# Altium PCB PCB1_new.PcbDoc (part 2 of 2)
Units mm, origin at the board's own origin, x right, y up, seen from the top; angles counter-clockwise.
Board outline 99.2 x 57.3 mm, 2 copper layers (Top Layer, Bottom Layer), stack 1.571 mm thick; 110 components, 84 nets, 483 pads, 693 vias.
Unrouted connection lines stored in the file: 9.
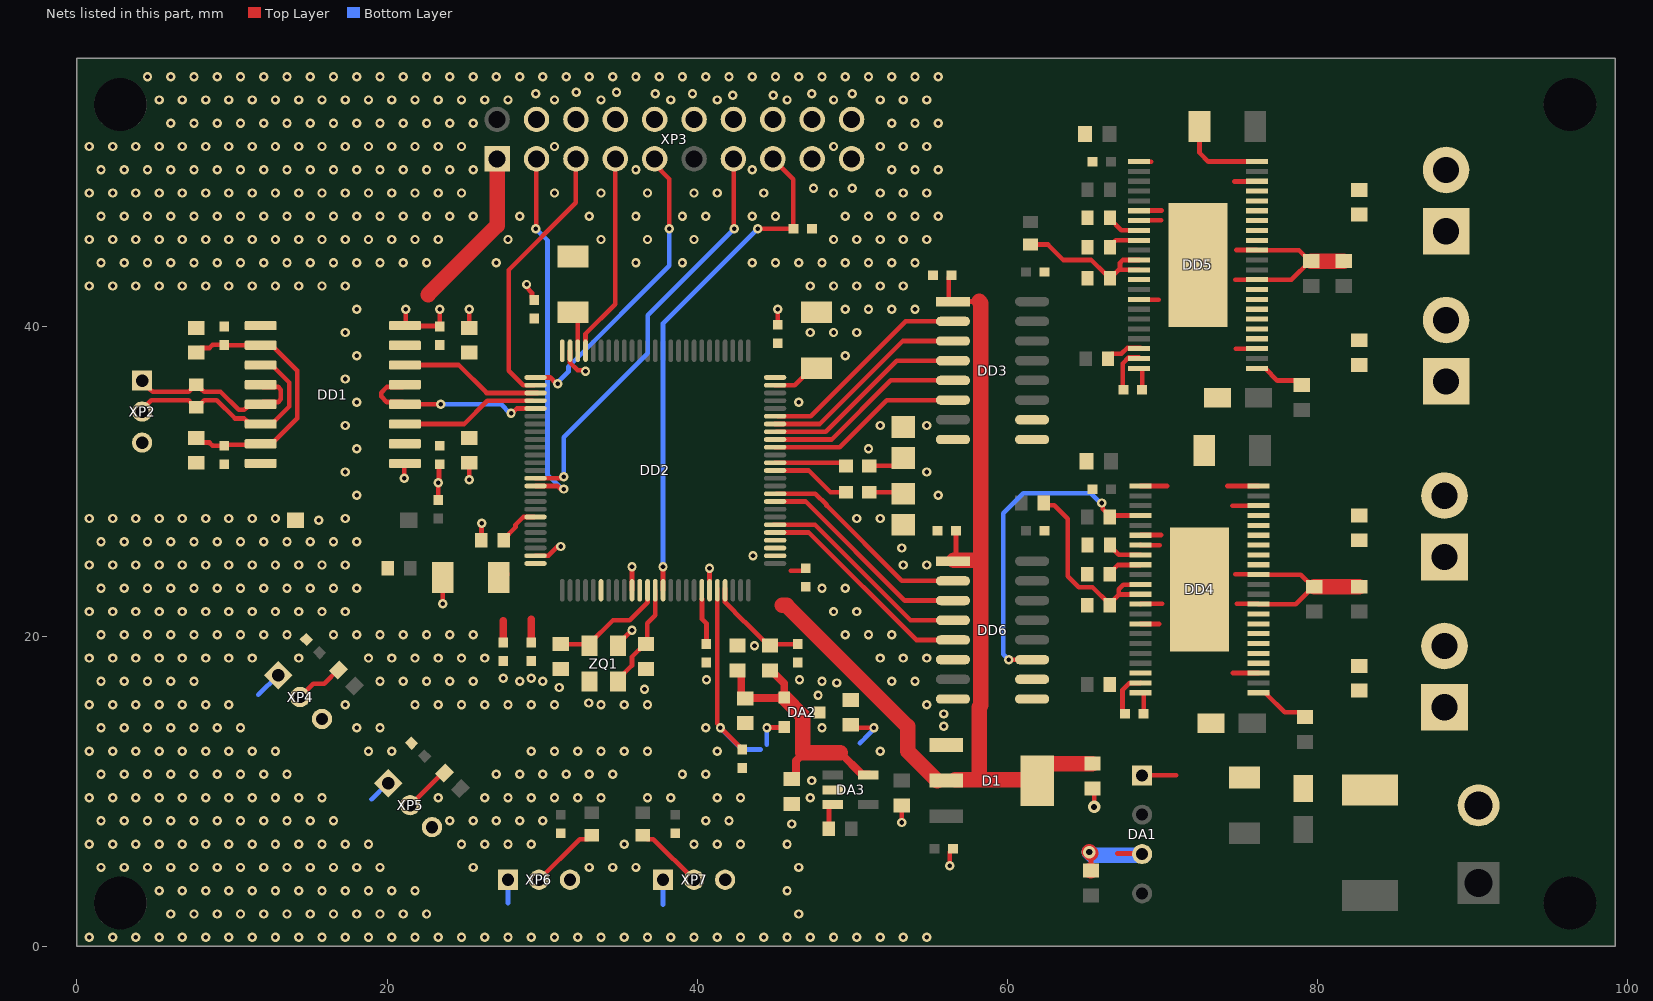
[diagram p2: the nets of this part, all layers, seen from the top]

## Via types
v1: diameter 0.6, hole 0.3, Top Layer to Bottom Layer, tented both sides, 658 vias
v2: diameter 1, hole 0.6, Top Layer to Bottom Layer, tented both sides, 33 vias
v3: diameter 0.8, hole 0.4, Top Layer to Bottom Layer, tented both sides, 2 vias

## Nets (pads, with @x,y where several pads share a name; then routed paths per layer and width w, separated by ;. In a path a pad name is that pad's centre, name@x,y a point inside that pad or via, vN(x,y) a via of type N, cw(c..) or ccw(c..) an arc to the next point about the centre after c; other vN are vias at no path point) (continued)
FAULT_DRV_2: DD4.26 DD6.11 R11.2 | length 20.5
  Top Layer w0.3: v1(60.1,18.5) DD6.11@60.8,18.5 ; v1(66.1,28.6) 66.157,28.543 66.157,28.218 66.6,27.775 R11.2@66.6,27.7 ; R11.2@66.605,27.795 DD4.26@68.598,27.795
  Bottom Layer w0.3: v1(60.1,18.5) 59.75,18.85 59.75,27.952 61.034,29.237 65.382,29.237 66.019,28.6 v1(66.1,28.6)
GND_ISO: C1.1 C2.1 C8.1 C9.1 DD1.9 DD1.16 XP2.3
GND_MCU: C3.1 C4.1 C5.1 C6.1 C7.1 C12.2 C13.1 C14.2 C15.1 C16.1 C17.1 C18.1 C19.1 C20.1 C21.2 C22.2 C23.1 C24.1 C25.1 C26.1 C27.1 C28.1 C29.1 C30.1 C31.1 C32.1 C33.1 C34.1 C35.1 C36.1 C37.1 C38.1 C61.1 D1.1 DA1.3 DA2.3 DA3.2 DD1.1 DD1.8 DD2.10 DD2.20 DD2.27 DD2.74 DD2.99 DD3.8 DD6.8 R6.1 R8.1 R10.1 S1.2 XP3.4 XP3.6 XP3.8 XP3.10 XP3.12 XP3.14 XP3.16 XP3.17 XP3.18 XP3.19 XP3.20 XP4.3 XP5.3 XP6.3 XP7.3 ZQ1.3 | length 33.6
  Top Layer w0.3: XP4.3@15.803,14.636 XP4.3@15.803,14.675 ; v1(21.1,30.2) 21.1,31.1 DD1.1@21.155,31.155 ; v1(21.2,41.1) 21.2,40.09 DD1.8@21.155,40.045 21.179,40.021 23.376,40.021 C14.2@23.4,39.997 v1(23.4,41.1) ; XP5.3@22.9,7.65 XP5.3@22.9,7.7 ; C35.1@23.3,28.8 v1(23.3,29.9) 23.35,29.95 23.35,31.053 C12.2@23.4,31.103 ; v1(23.6,22.1) C34.1@23.6,23.8 ; v1(25.3,30.1) C16.1@25.3,31.2 ; C15.1@25.3,39.9 v1(25.3,41.1) ; R6.1@26.075,26.2 26.088,26.213 26.088,27.287 v1(26.1,27.3) ; v1(29,42.7) 29,42.511 29.345,42.166 29.345,41.852 C27.1@29.5,41.697 ; DD2.99@29.575,25.2 30.411,25.2 31.011,25.8 v1(31.2,25.8) ; DD2.74@31.8,38.425 31.8,37.85 31.8,37.643 32.286,37.157 32.743,37.157 v1(32.8,37.1) ; ZQ1.3@33.05,17.1 ZQ1.3@33.05,17.225 ; ZQ1.3@34.9,19.4 34.9,19.525 35.775,20.4 v1(35.8,20.4) ; DD2.10@35.8,22.975 v1(35.8,24.5) ; v1@40.7,24.4 40.8,24.3 DD2.20@40.8,22.975 ; XP7.3@41.8,4.303 XP7.3@41.8,4.352 ; C23.1@45.2,40.1 v1(45.2,41.1) ; C21.2@47.6,40.8 C21.2@47.7,40.9 ; v1(53.2,8) C25.1@53.2,8.7 ; v1(56.3,5.2) 56.3,6.1 C19.1@56.5,6.3 ; v3(65.292,6.086) 65.292,5.951 65.4,5.843 C18.1@65.4,4.9 ; C20.1@65.5,10.3 65.6,10.2 v3(65.6,9) ; 67.1,6 DA1.3@68.7,6
  Top Layer w1: v3@65.3,6.1 v3@65.375,6.025 ; C18.1@65.375,4.925 C18.1@65.4,4.9
  Bottom Layer w1: v3(65.292,6.086) 65.478,5.9 68.436,5.9 68.441,5.905 DA1.3@68.833,5.905
  other v1: 0.8,0.6 2.3,0.6 3.8,0.6 5.3,0.6 6.8,0.6 8.3,0.6 9.8,0.6 11.3,0.6 12.8,0.6 14.3,0.6 15.8,0.6 17.3,0.6 18.8,0.6 20.3,0.6 21.8,0.6 23.3,0.6 24.8,0.6 26.3,0.6 27.8,0.6 29.3,0.6 30.8,0.6 32.3,0.6 33.8,0.6 35.3,0.6 36.8,0.6 38.3,0.6 39.8,0.6 41.3,0.6 42.8,0.6 44.3,0.6 45.8,0.6 47.3,0.6 48.8,0.6 50.3,0.6 51.8,0.6 53.3,0.6 54.8,0.6 6.05,2.1 7.55,2.1 9.05,2.1 10.55,2.1 12.05,2.1 13.55,2.1 15.05,2.1 16.55,2.1 18.05,2.1 19.55,2.1 21.05,2.1 22.55,2.1 46.55,2.1 5.3,3.6 6.8,3.6 8.3,3.6 9.8,3.6 11.3,3.6 12.8,3.6 14.3,3.6 15.8,3.6 17.3,3.6 18.8,3.6 20.3,3.6 21.8,3.6 45.8,3.6 1.55,5.1 3.05,5.1 4.55,5.1 6.05,5.1 7.55,5.1 9.05,5.1 10.55,5.1 12.05,5.1 13.55,5.1 15.05,5.1 16.55,5.1 18.05,5.1 19.55,5.1 25.55,5.1 33.05,5.1 34.55,5.1 36.05,5.1 46.55,5.1 0.8,6.6 2.3,6.6 3.8,6.6 5.3,6.6 6.8,6.6 8.3,6.6 9.8,6.6 11.3,6.6 12.8,6.6 14.3,6.6 15.8,6.6 17.3,6.6 18.8,6.6 24.8,6.6 26.3,6.6 27.8,6.6 29.3,6.6 35.3,6.6 39.8,6.6 41.3,6.6 42.8,6.6 45.8,6.6 46.1,7.9 1.55,8.1 3.05,8.1 4.55,8.1 6.05,8.1 7.55,8.1 9.05,8.1 10.55,8.1 12.05,8.1 13.55,8.1 15.05,8.1 16.55,8.1 24.05,8.1 25.55,8.1 27.05,8.1 28.55,8.1 30.05,8.1 40.55,8.1 42.05,8.1 0.8,9.6 2.3,9.6 3.8,9.6 5.3,9.6 6.8,9.6 8.3,9.6 9.8,9.6 11.3,9.6 12.8,9.6 14.3,9.6 15.8,9.6 23.3,9.6 26.3,9.6 27.8,9.6 29.3,9.6 30.8,9.6 32.3,9.6 33.8,9.6 36.8,9.6 38.3,9.6 41.3,9.6 42.8,9.6 47.3,9.6 47.4,10.7 1.55,11.1 3.05,11.1 4.55,11.1 6.05,11.1 7.55,11.1 9.05,11.1 10.55,11.1 12.05,11.1 13.55,11.1 27.05,11.1 28.55,11.1 30.05,11.1 31.55,11.1 33.05,11.1 34.55,11.1 39.05,11.1 40.55,11.1 0.8,12.6 2.3,12.6 3.8,12.6 5.3,12.6 6.8,12.6 8.3,12.6 9.8,12.6 11.3,12.6 12.8,12.6 18.8,12.6 20.3,12.6 29.3,12.6 30.8,12.6 32.3,12.6 33.8,12.6 35.3,12.6 36.8,12.6 41.3,12.6 51.8,12.6 1.55,14.1 3.05,14.1 4.55,14.1 6.05,14.1 7.55,14.1 9.05,14.1 10.55,14.1 18.05,14.1 19.55,14.1 40.55,14.1 48.05,14.1 55.9,14.2 55.9,15 0.8,15.6 2.3,15.6 3.8,15.6 5.3,15.6 6.8,15.6 8.3,15.6 9.8,15.6 17.3,15.6 21.8,15.6 23.3,15.6 24.8,15.6 26.3,15.6 27.8,15.6 29.3,15.6 30.8,15.6 33.8,15.6 35.3,15.6 36.8,15.6 54.8,15.6 33,15.7 47.8,16.2 36.6,16.6 31.1,16.7 49,17 1.55,17.1 3.05,17.1 4.55,17.1 6.05,17.1 7.55,17.1 19.55,17.1 21.05,17.1 22.55,17.1 24.05,17.1 25.55,17.1 28.55,17.1 30.05,17.1 48.05,17.1 52.55,17.1 54.05,17.1 40.6,17.2 46.6,17.2 27.5,17.3 29.3,17.3 0.8,18.6 2.3,18.6 3.8,18.6 5.3,18.6 6.8,18.6 8.3,18.6 9.8,18.6 11.3,18.6 14.3,18.6 18.8,18.6 20.3,18.6 21.8,18.6 23.3,18.6 24.8,18.6 26.3,18.6 51.8,18.6 53.3,18.6 54.8,18.6 43.7,19.4 1.55,20.1 3.05,20.1 4.55,20.1 6.05,20.1 7.55,20.1 9.05,20.1 10.55,20.1 12.05,20.1 13.55,20.1 16.55,20.1 18.05,20.1 19.55,20.1 21.05,20.1 22.55,20.1 24.05,20.1 25.55,20.1 49.55,20.1 51.05,20.1 52.55,20.1 0.8,21.6 2.3,21.6 3.8,21.6 5.3,21.6 6.8,21.6 8.3,21.6 9.8,21.6 11.3,21.6 12.8,21.6 14.3,21.6 15.8,21.6 17.3,21.6 48.8,21.6 50.3,21.6 1.55,23.1 3.05,23.1 4.55,23.1 6.05,23.1 7.55,23.1 9.05,23.1 10.55,23.1 12.05,23.1 13.55,23.1 15.05,23.1 16.55,23.1 18.05,23.1 48.05,23.1 49.55,23.1 40.8,24.4 0.8,24.6 2.3,24.6 3.8,24.6 5.3,24.6 6.8,24.6 8.3,24.6 9.8,24.6 11.3,24.6 12.8,24.6 14.3,24.6 15.8,24.6 17.3,24.6 53.3,24.6 54.8,24.6 43.6,25.2 53.2,25.7 1.55,26.1 3.05,26.1 4.55,26.1 6.05,26.1 7.55,26.1 9.05,26.1 10.55,26.1 12.05,26.1 13.55,26.1 15.05,26.1 16.55,26.1 18.05,26.1 15.6,27.5 0.8,27.6 2.3,27.6 3.8,27.6 5.3,27.6 6.8,27.6 8.3,27.6 9.8,27.6 11.3,27.6 12.8,27.6 17.3,27.6 50.3,27.6 51.8,27.6 18.05,29.1 55.55,29.1 17.3,30.6 54.8,30.6 18.05,32.1 51.05,32.1 17.3,33.6 51.8,33.6 54.8,33.6 18.05,35.1 46.55,35.1 17.3,36.6 18.05,38.1 49.55,38.1 17.3,39.6 47.3,39.6 48.8,39.6 50.3,39.6 18.05,41.1 49.55,41.1 51.05,41.1 52.55,41.1 54.05,41.1 0.8,42.6 2.3,42.6 3.8,42.6 5.3,42.6 6.8,42.6 8.3,42.6 9.8,42.6 11.3,42.6 12.8,42.6 14.3,42.6 15.8,42.6 17.3,42.6 47.3,42.6 48.8,42.6 50.3,42.6 51.8,42.6 53.3,42.6 1.55,44.1 3.05,44.1 4.55,44.1 6.05,44.1 7.55,44.1 9.05,44.1 10.55,44.1 12.05,44.1 13.55,44.1 15.05,44.1 16.55,44.1 18.05,44.1 19.55,44.1 21.05,44.1 22.55,44.1 27.05,44.1 36.05,44.1 39.05,44.1 43.55,44.1 45.05,44.1 46.55,44.1 48.05,44.1 49.55,44.1 51.05,44.1 52.55,44.1 54.05,44.1 0.8,45.6 2.3,45.6 3.8,45.6 5.3,45.6 6.8,45.6 8.3,45.6 9.8,45.6 11.3,45.6 12.8,45.6 14.3,45.6 15.8,45.6 17.3,45.6 18.8,45.6 20.3,45.6 21.8,45.6 23.3,45.6 27.8,45.6 33.8,45.6 36.8,45.6 39.8,45.6 48.8,45.6 50.3,45.6 51.8,45.6 53.3,45.6 54.8,45.6 1.55,47.1 3.05,47.1 4.55,47.1 6.05,47.1 7.55,47.1 9.05,47.1 10.55,47.1 12.05,47.1 13.55,47.1 15.05,47.1 16.55,47.1 18.05,47.1 19.55,47.1 21.05,47.1 22.55,47.1 24.05,47.1 25.55,47.1 28.55,47.1 33.05,47.1 36.05,47.1 39.05,47.1 40.55,47.1 43.55,47.1 45.05,47.1 49.55,47.1 51.05,47.1 52.55,47.1 54.05,47.1 55.55,47.1 0.8,48.6 2.3,48.6 3.8,48.6 5.3,48.6 6.8,48.6 8.3,48.6 9.8,48.6 11.3,48.6 12.8,48.6 14.3,48.6 15.8,48.6 17.3,48.6 18.8,48.6 20.3,48.6 21.8,48.6 23.3,48.6 24.8,48.6 30.8,48.6 33.8,48.6 36.8,48.6 39.8,48.6 41.3,48.6 44.3,48.6 48.8,48.6 51.8,48.6 53.3,48.6 54.8,48.6 47.5,48.9 50,48.9 1.55,50.1 3.05,50.1 4.55,50.1 6.05,50.1 7.55,50.1 9.05,50.1 10.55,50.1 12.05,50.1 13.55,50.1 15.05,50.1 16.55,50.1 18.05,50.1 19.55,50.1 21.05,50.1 22.55,50.1 24.05,50.1 25.55,50.1 36.05,50.1 43.55,50.1 52.55,50.1 54.05,50.1 55.55,50.1 0.8,51.6 2.3,51.6 3.8,51.6 5.3,51.6 6.8,51.6 8.3,51.6 9.8,51.6 11.3,51.6 12.8,51.6 14.3,51.6 15.8,51.6 17.3,51.6 18.8,51.6 20.3,51.6 21.8,51.6 23.3,51.6 24.8,51.6 30.8,51.6 48.8,51.6 51.8,51.6 53.3,51.6 54.8,51.6 6.05,53.1 7.55,53.1 9.05,53.1 10.55,53.1 12.05,53.1 13.55,53.1 15.05,53.1 16.55,53.1 18.05,53.1 19.55,53.1 21.05,53.1 22.55,53.1 24.05,53.1 25.55,53.1 52.55,53.1 54.05,53.1 55.55,53.1 5.3,54.6 6.8,54.6 8.3,54.6 9.8,54.6 11.3,54.6 12.8,54.6 14.3,54.6 15.8,54.6 17.3,54.6 18.8,54.6 20.3,54.6 21.8,54.6 23.3,54.6 24.8,54.6 26.3,54.6 27.8,54.6 30.8,54.6 33.8,54.6 38.3,54.6 41.3,54.6 45.8,54.6 48.8,54.6 51.8,54.6 53.3,54.6 54.8,54.6 42.3,54.9 44.9,54.9 29.6,55 37.3,55 39.7,55 47.4,55 50,55 32.2,55.1 34.8,55.1 4.55,56.1 6.05,56.1 7.55,56.1 9.05,56.1 10.55,56.1 12.05,56.1 13.55,56.1 15.05,56.1 16.55,56.1 18.05,56.1 19.55,56.1 21.05,56.1 22.55,56.1 24.05,56.1 25.55,56.1 27.05,56.1 28.55,56.1 30.05,56.1 31.55,56.1 33.05,56.1 34.55,56.1 36.05,56.1 37.55,56.1 39.05,56.1 40.55,56.1 42.05,56.1 43.55,56.1 45.05,56.1 46.55,56.1 48.05,56.1 49.55,56.1 51.05,56.1 52.55,56.1 54.05,56.1 55.55,56.1
GND_PWR: C10.2 C11.1 C41.1 C42.1 C44.1 C45.1 C47.1 C48.1 C49.1 C50.2 C52.1 C53.1 C54.1 C55.1 C56.1 C58.2 DA1.1 DD3.9 DD3.10 DD4.3 DD4.10 DD4.13 DD4.20 DD4.22 DD4.23 DD4.28 DD4.29 DD4.35 DD4.37 DD4.45 DD5.3 DD5.10 DD5.13 DD5.20 DD5.22 DD5.23 DD5.28 DD5.29 DD5.35 DD5.37 DD5.у DD6.9 DD6.10 R12.2 R13.2 R16.1 R18.1 R20.2 R21.2 VD1.1 XP1.2 | length 55.2
  Top Layer w0.3: R16.1@64.9,22.325 65.15,22.075 R16.1@65.15,22 ; DD5.37@68.498,41.735 68.513,41.72 69.78,41.72 ; DD5.35@68.498,43.005 DD5.35@68.503,43 ; DD5.29@68.498,46.815 68.513,46.83 69.93,46.83 ; DD5.28@68.498,47.45 68.513,47.465 69.965,47.465 ; DD5.23@68.498,50.625 68.513,50.61 69.289,50.61 ; DD4.37@68.598,20.81 68.613,20.795 69.805,20.795 ; DD4.35@68.598,22.08 68.613,22.095 69.995,22.095 ; DD4.29@68.598,25.89 68.613,25.875 69.825,25.875 ; DD4.28@68.598,26.525 68.613,26.54 69.94,26.54 ; DD4.23@68.598,29.7 70.3,29.7 ; DA1.1@68.7,11.04 70.896,11.04 ; C55.1@72.4,52.9 72.4,51.2 72.975,50.625 DD5.22@76.1,50.625 DD5.22@76.185,50.625 ; 74.2,29.7 DD4.22@76.2,29.7 ; 74.53,28.43 DD4.20@76.2,28.43 ; 74.535,17.635 DD4.3@76.2,17.635 ; 74.64,49.34 76.085,49.34 DD5.20@76.1,49.355 ; 74.7,43 76.095,43 DD5.10@76.1,43.005 78.33,43.005 C53.1@79.525,44.2 ; 74.7,24 76.185,24 DD4.13@76.2,23.985 78.94,23.985 C44.1@79.725,23.2 ; 74.745,38.545 76.085,38.545 DD5.3@76.1,38.56 ; 74.775,44.925 76.085,44.925 DD5.13@76.1,44.91 78.815,44.91 C53.1@79.525,44.2 ; 74.805,22.095 76.185,22.095 DD4.10@76.2,22.08 78.605,22.08 C44.1@79.725,23.2 ; C53.1@79.6,44.2 C53.1@79.525,44.2 ; C44.1@79.8,23.2 C44.1@79.725,23.2 ; C41.1@82.7,23.2 C41.1@82.8,23.3 ; XP1.2@90.012,9.1 XP1.2@90.4,9.1
  Top Layer w1: C53.1@79.6,44.2 C49.1@81.7,44.2 ; C44.1@79.8,23.2 C41.1@82.7,23.2
JTAG_TCK: DD2.76 XP3.9 | length 19.5
  Top Layer w0.3: DD2.76@29.5,36.7 30.519,36.7 30.919,36.3 v1(31,36.3) ; XP3.9@37.26,50.8 37.26,50.438 38.2,49.498 v1(38.2,46.3)
  Bottom Layer w0.3: v1(31,36.3) 31,36.381 31.7,37.081 31.7,37.39 31.9,37.59 31.9,37.6 38.2,43.9 v1(38.2,46.3)
JTAG_TDI: DD2.77 XP3.5 | length 17.5
  Top Layer w0.3: DD2.77@29.5,36.2 28.793,36.2 27.85,37.143 27.85,43.631 32.18,47.961 XP3.5@32.18,50.8
JTAG_TDO: DD2.89 XP3.13 | length 26.9
  Top Layer w0.3: DD2.89@29.575,30.2 31.219,30.2 31.319,30.3 v1(31.4,30.3) ; XP3.13@42.34,50.8 42.37,50.77 42.37,46.33 v1(42.4,46.3)
  Bottom Layer w0.3: v1(31.4,30.3) 31.4,32.841 36.821,38.262 36.821,40.721 v1(42.4,46.3)
JTAG_TMS: DD2.72 XP3.7 | length 12.6
  Top Layer w0.3: DD2.72@32.8,39 32.8,39.505 34.72,41.425 XP3.7@34.72,50.8
JTAG_TRST: DD2.90 XP3.3 | length 24
  Top Layer w0.3: DD2.90@29.6,29.7 31.011,29.7 31.211,29.5 v1(31.4,29.5) ; v1(29.6,46.3) 29.62,46.32 29.62,50.78 XP3.3@29.64,50.8
  Bottom Layer w0.3: v1(29.6,46.3) 30.35,45.55 30.35,30.431 31.223,29.557 31.343,29.557 v1(31.4,29.5)
LED_ERROR: DD2.39 HL1.1 | length 4.7
  Top Layer w0.3: DD2.39@45.025,31.2 49.4,31.2 HL1.1@49.6,31
LED_OK: DD2.38 HL2.1 | length 5.2
  Top Layer w0.3: DD2.38@45,30.7 47.2,30.7 48.6,29.3 HL2.1@49.6,29.3
M1_OUT_+: C59.2 DD5.4 DD5.5 DD5.6 XP8.1
M1_OUT_-: C59.1 DD5.7 DD5.8 DD5.9 XP8.2
M2_OUT_+: C60.1 DD5.14 DD5.15 DD5.16 XP9.1
M2_OUT_-: C60.2 DD5.17 DD5.18 DD5.19 XP9.2
M3_OUT_+: C39.2 DD4.4 DD4.5 DD4.6 XP10.1
M3_OUT_-: C39.1 DD4.7 DD4.8 DD4.9 XP10.2
M4_OUT_+: C40.1 DD4.14 DD4.15 DD4.16 XP11.1
M4_OUT_-: C40.2 DD4.17 DD4.18 DD4.19 XP11.2
MCU_DIR_M1: DD2.44 DD3.3 | length 13.7
  Top Layer w0.3: DD2.44@45,33.7 47.905,33.7 53.255,39.05 DD3.3@56.5,39.05
MCU_DIR_M2: DD2.42 DD3.5 | length 12.9
  Top Layer w0.3: DD2.42@45.155,32.7 48.675,32.7 52.485,36.51 DD3.5@56.5,36.51
MCU_DIR_M3: DD2.34 DD6.3 | length 14.1
  Top Layer w0.3: DD2.34@45,28.7 47,28.7 53.39,22.31 DD6.3@56.5,22.31
MCU_DIR_M4: DD2.30 DD6.5 | length 14.4
  Top Layer w0.3: DD2.30@45,26.7 47.2,26.7 54.13,19.77 DD6.5@56.5,19.77
MCU_FAULT_DRV_1: DD2.41 DD3.6 | length 12.8
  Top Layer w0.3: DD2.41@45,32.2 49.2,32.2 52.24,35.24 DD3.6@56.5,35.24
MCU_FAULT_DRV_2: DD2.29 DD6.6
MCU_PWM_M1: DD2.45 DD3.2 | length 13.8
  Top Layer w0.3: DD2.45@45.2,34.2 47.32,34.2 53.44,40.32 DD3.2@56.5,40.32
MCU_PWM_M2: DD2.43 DD3.4 | length 13.3
  Top Layer w0.3: DD2.43@45.1,33.2 48.29,33.2 52.87,37.78 DD3.4@56.5,37.78
MCU_PWM_M3: DD2.35 DD6.2 | length 13.7
  Top Layer w0.3: DD2.35@45.1,29.2 47.621,29.2 48.345,28.476 48.345,28.44 53.205,23.58 DD6.2@56.5,23.58
MCU_PWM_M4: DD2.31 DD6.4 | length 14.2
  Top Layer w0.3: DD2.31@44.9,27.2 47.6,27.2 53.76,21.04 DD6.4@56.5,21.04
NetC1_2: C1.2 C2.2 C8.2 C9.2 DD1.10 DD1.15 | length 17.8
  Top Layer w0.3: C2.2@7.7,32.8 8,32.5 8.545,32.5 8.745,32.3 C8.2@9.6,32.3 ; C1.2@7.7,38.3 8,38.6 8.545,38.6 8.745,38.8 C9.2@9.5,38.8 9.512,38.788 DD1.10@11.832,38.788 ; C8.2@9.6,32.361 11.781,32.361 DD1.15@11.845,32.425 ; DD1.10@11.845,38.775 12.57,38.775 14.2,37.145 14.2,34.055 12.72,32.575 11.975,32.575 DD1.15@11.9,32.5
NetC17_2: C17.2 DD2.22 FB1.2 | length 6.8
  Top Layer w0.3: DD2.22@41.8,23.1 41.8,22.193 43.046,20.946 43.079,20.946 44.625,19.4 FB1.2@44.7,19.4 44.8,19.5 C17.2@46.5,19.5
NetC21_1: C21.1 DD2.49 | length 3.2
  Top Layer w0.3: DD2.49@45,36.2 46.3,36.2 47.4,37.3 C21.1@47.7,37.3
NetC22_1: C22.1 DD2.73 | length 2.7
  Top Layer w0.3: C22.1@32,40.9 32.2,40.9 32.3,40.8 DD2.73@32.3,38.425
NetC28_2: C28.2 DD2.13 ZQ1.1 | length 6.9
  Top Layer w0.3: ZQ1.1@34.9,17.1 34.9,17.225 35.8,18.125 35.8,18.675 36.625,19.5 C28.2@36.7,19.5 ; C28.2@36.775,19.5 36.775,20.837 37.3,21.363 DD2.13@37.3,22.975
NetC31_2: C31.2 DD2.12 ZQ1.2 | length 7.6
  Top Layer w0.3: C31.2@31.2,19.5 32.95,19.5 ZQ1.2@33.05,19.4 ; ZQ1.2@33.05,19.525 34.571,21.046 35.654,21.046 36.8,22.193 DD2.12@36.8,23
NetC43_1: C43.1 DD4.43 | length 3
  Top Layer w0.3: C43.1@67.603,15 67.591,15 67.436,15.155 67.436,16.564 67.857,16.985 68.585,16.985 DD4.43@68.6,17
NetC43_2: C43.2 DD4.44 | length 1.6
  Top Layer w0.3: DD4.44@68.6,16.38 68.768,16.38 68.797,16.35 C43.2@68.797,15
NetC46_1: C46.1 DD5.1 | length 3.4
  Top Layer w0.3: DD5.1@76.1,37.29 76.637,37.29 77.427,36.5 78.625,36.5 78.925,36.2 C46.1@79,36.2
NetC51_1: C51.1 DD4.1 | length 3.7
  Top Layer w0.3: DD4.1@76.2,16.365 76.737,16.365 76.752,16.35 76.752,16.246 77.898,15.1 78.9,15.1 C51.1@79.2,14.8
NetC57_1: C57.1 DD5.43 | length 2.9
  Top Layer w0.3: C57.1@67.506,35.9 67.446,35.96 67.446,37.6 67.846,38 DD5.43@68.5,38
NetC57_2: C57.2 DD5.44 | length 1.6
  Top Layer w0.3: DD5.44@68.5,37.3 68.675,37.3 68.7,37.275 C57.2@68.7,35.9
NetDA3_3: DA3.3 R7.2 | length 1.7
  Top Layer w0.3: R7.2@48.5,7.6 48.5,9.005 48.595,9.1 DA3.3@48.8,9.1
NetDD2_94: DD2.94 R6.2 | length 2.7
  Top Layer w0.3: R6.2@27.525,26.2 27.525,26.275 28.284,27.034 28.284,27.191 28.793,27.7 DD2.94@29.5,27.7
NetDD4_30: DD4.30 R12.1 | length 2.3
  Top Layer w0.3: R12.1@66.625,25.9 66.625,25.825 67.18,25.27 68.584,25.27 DD4.30@68.598,25.255
NetDD4_31: DD4.31 R13.1 | length 2.3
  Top Layer w0.3: R13.1@66.6,24 66.6,24.075 67.13,24.605 68.584,24.605 DD4.31@68.598,24.62
NetDD4_33: DD4.33 DD4.34 R15.1 R16.2 | length 13.4
  Top Layer w0.3: R15.1@62.35,28.6 62.49,28.46 63.024,28.46 63.9,27.584 63.9,23.88 64.605,23.175 65.5,23.175 66.577,22.098 R16.2@66.577,22 ; R16.2@66.6,22 66.6,22.075 67.2,22.675 ; DD4.34@68.598,22.715 68.584,22.7 67.225,22.7 67.2,22.675 ; DD4.33@68.598,23.35 68.061,23.35 68.046,23.335 67.486,23.335 67.2,23.049 67.2,22.675
NetDD4_42: DD4.42 R14.2
NetDD5_30: DD5.30 R21.1 | length 2.2
  Top Layer w0.3: R21.1@66.628,47 66.628,46.925 67.358,46.195 68.488,46.195 DD5.30@68.496,46.186
NetDD5_31: DD5.31 R20.1 | length 2.1
  Top Layer w0.3: R20.1@66.628,45.1 66.628,45.175 66.998,45.545 DD5.31@68.498,45.545
NetDD5_33: DD5.33 DD5.34 R17.1 R18.2 | length 9.9
  Top Layer w0.3: R17.1@61.5,45.275 62.625,45.275 63.625,44.275 65.425,44.275 66.275,43.425 66.375,43.425 66.625,43.175 R18.2@66.625,43.1 ; R18.2@66.638,43.088 67.189,43.639 DD5.34@68.497,43.639 ; 67.274,43.639 67.274,44.099 67.45,44.275 DD5.33@68.498,44.275
NetDD5_42: DD5.42 R19.2 | length 2.4
  Top Layer w0.3: R19.2@66.5,37.9 66.5,37.975 66.75,38.225 67.364,38.225 67.739,38.6 DD5.42@68.6,38.6
NetHL1_2: HL1.2 R8.2 | length 2.4
  Top Layer w0.3: HL1.2@51.1,31 52.5,31 52.507,31.007 52.807,31.007 R8.2@53.3,31.5
NetHL2_2: HL2.2 R10.2 | length 2.2
  Top Layer w0.3: HL2.2@51.1,29.3 53.2,29.3 R10.2@53.3,29.2
NetR1_1: R1.1 XP7.2 | length 4.4
  Top Layer w0.3: R1.1@36.6,7.1 36.775,6.925 37.178,6.925 XP7.2@39.8,4.303
NetR2_1: R2.1 XP4.2 | length 3.3
  Top Layer w0.3: XP4.2@14.389,16.089 15.251,16.951 15.951,16.951 R2.1@16.9,17.9
NetR3_1: R3.1 XP5.2 | length 3.2
  Top Layer w0.3: XP5.2@21.486,9.114 21.5,9.114 23.686,11.3 R3.1@23.8,11.3
NetR4_1: R4.1 XP6.2 | length 4.6
  Top Layer w0.3: XP6.2@29.8,4.303 32.421,6.925 32.925,6.925 R4.1@33.2,7.2
RESET: C7.2 DD2.14 XP3.15 | length 33.2
  Top Layer w0.3: DD2.14@37.8,22.975 v1(37.8,24.5) ; v1(43.9,46.3) 46.2,46.3 46.203,46.303 46.203,49.477 XP3.15@44.88,50.8
  Bottom Layer w0.3: v1(37.8,24.5) 37.8,40.2 v1(43.9,46.3)
RS485_DIR: DD1.4 DD1.5 DD2.80 | length 12.5
  Top Layer w0.3: DD1.5@21.155,36.235 21.006,36.086 19.986,36.086 19.624,35.724 19.624,35.476 19.986,35.114 21.006,35.114 DD1.4@21.155,34.965 v1(23.465,34.965) ; v1(28,34.4) 28.081,34.4 28.381,34.7 DD2.80@29.6,34.7
  Bottom Layer w0.3: v1(23.465,34.965) 27.354,34.965 27.919,34.4 v1(28,34.4)
RS_N: DD1.12 DD1.13 R5.2 XP2.1 | length 12.5
  Top Layer w0.3: XP2.1@4.2,36.5 4.704,35.996 4.704,35.953 4.88,35.777 7.199,35.777 7.375,35.953 7.375,35.975 7.625,36.225 7.775,36.225 8.025,35.975 8.025,35.953 8.201,35.777 9.257,35.777 10.427,34.607 10.794,34.607 10.97,34.783 10.97,34.815 11.12,34.965 DD1.13@11.845,34.965 11.993,35.113 12.97,35.113 13.146,35.289 13.146,35.911 12.97,36.087 11.993,36.087 DD1.12@11.845,36.235
RS_P: DD1.11 DD1.14 R5.1 XP2.2 | length 15.4
  Top Layer w0.3: XP2.2@4.2,34.5 4.2,34.633 4.79,35.223 7.199,35.223 7.375,35.047 7.375,35.025 7.625,34.775 7.775,34.775 8.025,35.025 8.025,35.047 8.201,35.223 9.027,35.223 10.197,34.053 10.794,34.053 10.97,33.877 10.97,33.845 11.12,33.695 DD1.14@11.845,33.695 ; DD1.14@11.8,33.6 12.475,33.6 13.7,34.825 13.7,36.375 12.57,37.505 DD1.11@11.845,37.505
UART_RX: DD1.3 DD2.79 | length 8.9
  Top Layer w0.3: DD1.3@21.155,33.695 24.963,33.695 26.468,35.2 DD2.79@29.4,35.2
UART_TX: DD1.6 DD2.78 | length 9.3
  Top Layer w0.3: DD1.6@21.155,37.505 24.613,37.505 26.418,35.7 DD2.78@29.7,35.7
VDD: C12.1 C14.1 C15.2 C16.2 C20.2 C23.2 C24.2 C27.2 C29.2 C30.2 C32.2 C34.2 C38.2 C61.2 D1.2 DD1.2 DD1.7 DD2.6 DD2.11 DD2.19 DD2.28 DD2.50 DD2.75 DD2.100 DD3.1 DD6.1 R9.2 XP3.1 | length 81.1
  Top Layer w0.3: DD3.1@56.05,41.7 56.186,41.7 56.229,41.744 56.229,43.145 56.384,43.3 C38.2@56.397,43.3 ; DD6.1@56.5,24.85 56.543,24.85 56.697,25.004 C61.2@56.697,26.8 ; DD3.1@56.5,41.59 56.51,41.6 58.2,41.6
  Top Layer w0.31: DD2.19@40.305,22.405 40.305,21.129 40.6,20.834 C29.2@40.6,19.5 ; 46.034,24.234 46.85,24.234 47,24.384 C32.2@47,24.397
  Top Layer w0.5: C24.2@27.5,19.6 27.5,21 ; C30.2@29.3,19.6 29.3,21.1
  Top Layer w1: 22.651,42.049 27.1,46.497 27.1,46.5 XP3.1@27.1,50.8 ; C34.2@27.2,23.8 C34.2@27.4,24 ; 45.5,22 45.765,22 53.577,14.188 53.577,12.598 55.475,10.7 D1.2@55.5,10.7 ; DD6.1@56.55,24.9 58.1,24.9 ; D1.2@56.65,10.75 58.2,10.75 ; 58.2,41.6 58.302,41.498 58.302,25.002 58.2,24.9 58.302,24.798 58.302,15.544 58.2,15.442 58.2,10.75 ; D1.2@61.525,11.1 61.525,10.925 61.35,10.75 58.2,10.75 ; D1.2@61.925,10.7 61.925,11.25 62.475,11.8 C20.2@65.475,11.8
VDDA: C13.2 C26.2 C37.2 DA2.1 DA3.5 FB1.1 | length 17.7
  Top Layer w0.5: C13.2@42.6,17.8 42.65,17.8 42.85,17.6 42.85,16.15 C26.2@43,16 ; C26.2@43.1,16 43.126,16.026 45.574,16.026 DA2.1@45.6,16.053 ; FB1.1@44.7,17.8 44.775,17.8 45.614,16.961 DA2.1@45.614,16.053 ; C37.2@46.1,10.8 46.175,10.8 46.375,11 46.375,11.975 46.9,12.5 ; 49.23,12.5 50.635,11.095 DA3.5@51.1,11.095
  Top Layer w1: DA2.1@45.614,16.053 46.8,14.867 46.8,12.5 49.23,12.5
VREF+: C33.2 C36.2 DA2.2 DD2.21 XP4.1 XP5.1 XP6.1 XP7.1 | length 25.8
  Top Layer w0.3: DD2.21@41.3,23.1 41.3,14.381 41.5,14.181 v1(41.5,14.1) 41.513,14.1 42.9,12.712 C36.2@42.9,12.7 ; v1(44.5,14.1) 44.524,14.124 45.59,14.124 DA2.2@45.614,14.148 ; C33.2@49.9,14.3 50.1,14.1 v1(51.4,14.1)
  Bottom Layer w0.3: 11.7,16.228 XP4.1@12.975,17.503 ; 19,9.5 20.028,10.528 XP5.1@20.072,10.528 ; 27.8,2.8 XP6.1@27.8,4.303 ; 37.8,2.7 XP7.1@37.8,4.303 ; v1(41.5,14.1) 42.9,12.7 44.1,12.7 ; 44.5,13 v1(44.5,14.1) ; 50.5,13.1 50.814,13.414 50.814,13.432 51.4,14.019 v1(51.4,14.1)
pads on no net: DA3.4 DD2.1 DD2.2 DD2.3 DD2.4 DD2.5 DD2.7 DD2.8 DD2.9 DD2.23 DD2.24 DD2.25 DD2.26 DD2.32 DD2.33 DD2.36 DD2.37 DD2.40 DD2.46 DD2.48 DD2.51 DD2.52 DD2.53 DD2.54 DD2.55 DD2.56 DD2.57 DD2.58 DD2.59 DD2.60 DD2.61 DD2.62 DD2.63 DD2.64 DD2.65 DD2.66 DD2.67 DD2.68 DD2.69 DD2.70 DD2.71 DD2.81 DD2.82 DD2.83 DD2.84 DD2.85 DD2.86 DD2.87 DD2.88 DD2.91 DD2.92 DD2.93 DD2.95 DD2.96 DD2.97 DD2.98 DD3.7 DD4.32 DD4.36 DD5.32 DD5.36 DD6.7 XP3.2 XP3.11

## Polygon pours and split planes (outlines as drawn)
GND_PWR on Top Layer "NONET_L-01_P-001" (solid, pour order 65): 69.6,13.3 61.2,13.3 61.2,34.6 69.6,34.6
GND_PWR on Top Layer "NONET_L-01_P-001" (solid, remove dead copper, pour order 62): 60.6,57.3 99.2,57.3 99.2,7.6 60.6,7.6
GND_MCU on Top Layer "GND_MCU_TOP" (solid, pour order 75): 0,0 0,57.3 56.3,57.3 56.3,-0.097
VDD on Top Layer "VDD_TOP" (solid, pour order 63): 18.8,20.8 18.8,42.1 46.1,42.1 46.3,41.9 46.3,20.8
+5В on Top Layer "+5В" (solid, pour order 61): 47.9,11.4 47.7,11.2 47.7,2.1 69.9,2.1 69.9,4.2 57,4.2 57,9.4 55.6,9.4 53.6,11.4
GND_ISO on Top Layer "NONET_L-01_P-001" (solid, pour order 74): 0,41 15.8,41 15.8,29.5 0,29.5
M1_OUT_- on Top Layer "NONET_L-01_P-001" (solid, pour order 24): 89.7,39.5 89.7,41.3 79.1,41.3 77.021,42.535 77.021,40.94 79.1,39.462
M1_OUT_+ on Top Layer "NONET_L-01_P-001" (solid, pour order 27): 77,40.629 81.4,37.2 81.4,35.6 77,39.029
M3_OUT_+ on Top Layer "NONET_L-01_P-001" (solid, pour order 55): 76.992,19.7 81.7,16.3 81.7,14.6 76.992,18
M3_OUT_+ on Top Layer "NONET_L-01_P-001" (solid, pour order 54): 75.39,17.972 75.389,19.803 77.003,19.803 75.39,19.563 77.003,19.803 76.992,17.963
M1_OUT_- on Top Layer "NONET_L-01_P-001" (solid, pour order 25): 75.399,40.938 75.398,40.94 75.398,42.535 76.928,42.535 77.021,42.535 77.021,40.94
M4_OUT_- on Top Layer "M4_OUT_-_L01_P049" (solid, pour order 49): 75.392,26.3 79.599,26.3 81.924,28.065 89.541,28.065 89.541,29.865 81.717,29.865 79.4,28 75.392,28
M4_OUT_+ on Top Layer "M4_OUT_+_L01_P050" (solid, pour order 50): 75.389,24.313 89.692,24.313 89.692,26 75.389,26
M3_OUT_+ on Top Layer "M3_OUT_+_L01_P051" (solid, pour order 51): 81.7,16.306 89.668,16.306 89.668,14.603 81.7,14.598
M3_OUT_- on Top Layer "NONET_L-01_P-001" (solid, pour order 52): 89.779,18.425 89.779,20.225 79.179,20.225 77.1,21.692 77.1,19.9 79.179,18.387
M3_OUT_- on Top Layer "NONET_L-01_P-001" (solid, pour order 53): 75.39,19.873 75.39,21.7 77.1,21.7 77.1,19.874
M1_OUT_+ on Top Layer "M1_OUT_+_L01_P019" (solid, pour order 19): 81.4,37.204 89.7,37.204 89.7,35.599 81.4,35.593
M1_OUT_+ on Top Layer "NONET_L-01_P-001" (solid, pour order 26): 75.398,39.039 75.398,40.629 75.397,40.63 75.398,40.63 77,40.63 77,39.03
M2_OUT_+ on Top Layer "M2_OUT_+_L01_P017" (solid, pour order 17): 75.397,45.38 89.7,45.38 89.7,46.98 75.397,46.98
M2_OUT_- on Top Layer "M2_OUT_-_L01_P015" (solid, pour order 15): 75.4,47.286 79.5,47.286 81.932,49.132 89.549,49.132 89.549,50.932 81.726,50.932 79.2,48.9 75.4,48.9
DVDD2 on Bottom Layer "DVDD2" (solid, pour order 69): 59.3,19.6 59.3,34.5 71,34.5 71,19.6
GND_MCU on Bottom Layer "NONET_L-01_P-001" (solid, pour order 72): 0,0 0,57.4 56.5,57.4 56.5,14.3 66.1,14.3 66.1,0.095
DVDD1 on Bottom Layer "DVDD1" (solid, pour order 71): 60.4,39.6 60.4,57.3 71.1,57.3 71.1,39.6
+24В on Bottom Layer "+24В" (solid, pour order 70): 72.5,18.4 62.8,18.4 62.8,15.4 72.5,15.4 72.5,0 99.2,0 99.2,57.5 72.8,57.5 72.8,38 63.8,38 63.8,36 72.5,36
VREF+ on Bottom Layer "NONET_L-01_P-001" (solid, pour order 58): 24.999,1.3 44,1.3 44,3.1 43.8,3.1 26.1,3.1
VREF+ on Bottom Layer "VREF+_BUTTOM_1" (solid, pour order 57): 9.3,16.9 25,1.3 26.495,2.795 10.729,18.439
VREF+ on Bottom Layer "VREF+_BUTTOM_2" (solid, pour order 59): 44,1.3 44,13.3 50.7,13.3 50.6,13.2 50.6,11.9 45.2,11.9 45.2,1.3 43.9,1.3

## Silkscreen, mask and mechanical layers (free items; w line width, h text height)
Top Overlay:
  drawing of 2 lines, arcs and shapes, not listed
Mechanical 1:
  the board outline again, w0.254